# Altium PCB 1SL1 Xilinx Spartan-11E PQ208.PcbDoc (part 3 of 5)
Units mil, origin at the board's own origin, x right, y up, seen from the top; angles counter-clockwise.
Board outline 7086.61 x 1988.19 mil, 2 copper layers (Top Layer, Bottom Layer), stack 29.698 mil thick; 115 components, 126 nets, 642 pads, 225 vias.
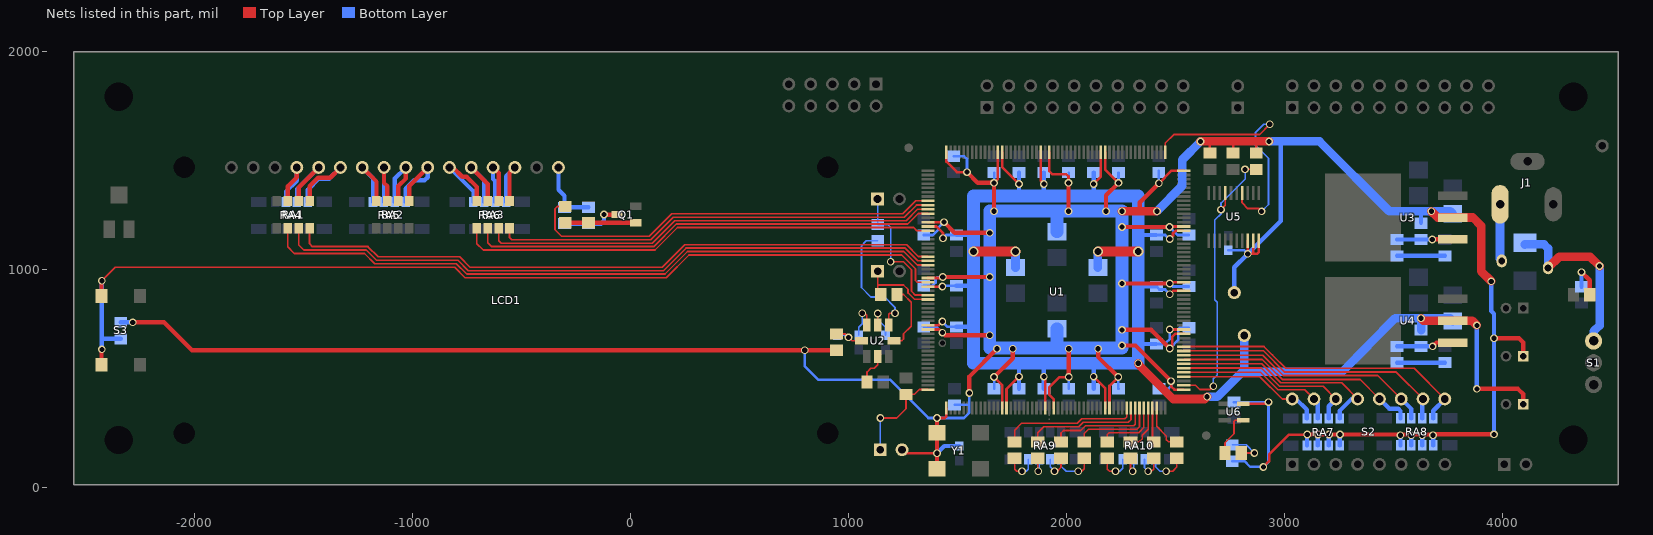
[diagram p2: the nets of this part, all layers, seen from the top]

## Via types
v1: diameter 35.43, hole 23.62, Top Layer to Bottom Layer, tented both sides, 168 vias
v2: diameter 59.06, hole 31.5, Top Layer to Bottom Layer, tented both sides, 27 vias
v3: diameter 47.24, hole 31.5, Top Layer to Bottom Layer, 18 vias
v4: diameter 47.24, hole 31.5, Top Layer to Bottom Layer, tented both sides, 11 vias
v5: diameter 35.43, hole 23.62, Top Layer to Bottom Layer, 1 vias

## Nets (pads, with @x,y where several pads share a name; then routed paths per layer and width w, separated by ;. In a path a pad name is that pad's centre, name@x,y a point inside that pad or via, vN(x,y) a via of type N, cw(c..) or ccw(c..) an arc to the next point about the centre after c; other vN are vias at no path point) (continued)
LCD_DB4: RA3.5 U1.15 | length 2201.6
  Top Layer w7.87: RA3.5@-704.87,1188.03 -704.87,1116.37 -676.13,1087.63 112.14,1087.63 215.49,1190.98 1298.78,1190.98 1313.55,1176.21 U1.15@1364.23,1176.21
LCD_DB5: RA3.6 U1.11 | length 2155.9
  Top Layer w7.87: RA3.6@-654.87,1188.03 -654.87,1121.49 -636.76,1103.38 105.62,1103.38 208.97,1206.72 1271.59,1206.72 1319.82,1254.95 U1.11@1364.23,1254.95
LCD_DB6: RA3.7 U1.10 | length 2095.7
  Top Layer w7.87: RA3.7@-604.87,1188.03 -604.87,1130.54 -593.45,1119.13 99.1,1119.13 202.44,1222.47 1263.83,1222.47 1316,1274.64 U1.10@1364.23,1274.64
LCD_DB7: RA3.8 U1.9 | length 2032.6
  Top Layer w7.87: RA3.8@-554.87,1188.03 -554.87,1144.52 -545.22,1134.87 92.57,1134.87 195.92,1238.22 1255.96,1238.22 1312.06,1294.32 U1.9@1364.23,1294.32
LCD_DB#0: LCD1.7 RA2.4 RA5.5 | length 360.5
  Top Layer w19.68: LCD1.7@-1230.65,1466.57 -1165.5,1401.41 RA2.4@-1165.5,1312.03
  Bottom Layer w19.68: LCD1.7@-1230.65,1466.57 -1181.24,1417.16 RA5.5@-1181.24,1308.09
LCD_DB#1: LCD1.8 RA2.3 RA5.6 | length 319.5
  Top Layer w19.68: LCD1.8@-1130.65,1466.57 -1130.65,1395.7 -1115.5,1380.54 RA2.3@-1115.5,1312.03
  Bottom Layer w19.68: RA5.6@-1131.24,1308.09 -1131.24,1465.98 LCD1.8@-1130.65,1466.57
LCD_DB#2: LCD1.9 RA2.2 RA5.7 | length 348.4
  Top Layer w19.68: RA2.2@-1065.5,1312.03 -1065.5,1380.94 -1030.65,1415.78 LCD1.9@-1030.65,1466.57
  Bottom Layer w19.68: RA5.7@-1081.24,1308.09 -1081.24,1415.98 LCD1.9@-1030.65,1466.57
LCD_DB#3: LCD1.10 RA2.1 RA5.8 | length 417.5
  Top Layer w19.68: RA2.1@-1015.5,1312.03 -1015.5,1381.72 LCD1.10@-930.65,1466.57
  Bottom Layer w19.68: RA5.8@-1031.24,1308.09 -1031.24,1368.34 -992.07,1407.51 -944.83,1407.51 -930.65,1421.68 LCD1.10@-930.65,1466.57
LCD_DB#4: LCD1.11 RA3.4 RA6.5 | length 431.4
  Top Layer w19.68: LCD1.11@-830.65,1466.57 -814.91,1466.57 -771.73,1423.39 -752.05,1423.39 -704.87,1376.21 RA3.4@-704.87,1312.03
  Bottom Layer w19.68: LCD1.11@-830.65,1466.57 -720.61,1356.53 RA6.5@-720.61,1308.09
LCD_DB#5: LCD1.12 RA3.3 RA6.6 | length 369.3
  Top Layer w19.68: LCD1.12@-730.65,1466.57 -654.87,1390.78 RA3.3@-654.87,1312.03
  Bottom Layer w19.68: LCD1.12@-730.65,1466.57 -670.61,1406.53 RA6.6@-670.61,1308.09
LCD_DB#6: LCD1.13 RA3.2 RA6.7 | length 327.8
  Top Layer w19.68: LCD1.13@-630.65,1466.57 -604.87,1440.78 RA3.2@-604.87,1312.03
  Bottom Layer w19.68: LCD1.13@-630.65,1466.57 -630.65,1413.61 -620.61,1403.57 RA6.7@-620.61,1308.09
LCD_DB#7: LCD1.14 RA3.1 RA6.8 | length 339.6
  Top Layer w19.68: RA3.1@-554.87,1312.03 -554.87,1442.35 LCD1.14@-530.65,1466.57
  Bottom Layer w19.68: RA6.8@-570.61,1308.09 -570.61,1426.61 LCD1.14@-530.65,1466.57
LCD_E: RA1.8 U1.21 | length 3018.1
  Top Layer w7.87: RA1.8@-1472.19,1188.03 -1472.19,1115.98 -1459.59,1103.38 -1204.67,1103.38 -1157.43,1056.13 -783.41,1056.13 -736.17,1008.89 144.76,1008.89 248.1,1112.24 1266.17,1112.24 1320.3,1058.1 U1.21@1364.23,1058.1
LCD_E#: LCD1.6 RA1.1 RA4.8 | length 493.5
  Top Layer w19.68: RA1.1@-1472.19,1312.03 -1472.19,1380.15 -1433.02,1419.32 -1377.9,1419.32 LCD1.6@-1330.65,1466.57
  Bottom Layer w19.68: RA4.8@-1480.06,1308.09 -1480.06,1364.4 -1429.28,1415.19 -1382.03,1415.19 LCD1.6@-1330.65,1466.57
LCD_LIGHT: R2.1 U1.8 | length 1938.7
  Top Layer w7.87: R2.1@-299.16,1287.43 -335.57,1287.43 -346.4,1276.61 -346.4,1180.15 -316.87,1150.62 86.05,1150.62 189.4,1253.97 1248.09,1253.97 1308.13,1314.01 U1.8@1364.23,1314.01
LCD_RS: RA1.6 U1.23 | length 3142.7
  Top Layer w7.87: RA1.6@-1572.19,1188.03 -1572.19,1101.79 -1542.28,1071.88 -1220.42,1071.88 -1173.17,1024.64 -799.16,1024.64 -751.91,977.39 157.8,977.39 261.15,1080.74 1253.01,1080.74 1315.02,1018.73 U1.23@1364.23,1018.73
LCD_RS#: LCD1.4 RA1.3 RA4.6 | length 350.7
  Top Layer w19.68: RA1.3@-1572.19,1312.03 -1572.19,1379.56 -1530.65,1421.09 LCD1.4@-1530.65,1466.57
  Bottom Layer w19.68: RA4.6@-1580.06,1308.09 -1580.06,1356.13 -1530.65,1405.54 LCD1.4@-1530.65,1466.57
LCD_RW: RA1.7 U1.22 | length 3079.2
  Top Layer w7.87: RA1.7@-1522.19,1188.03 -1522.19,1110.86 -1498.96,1087.63 -1212.54,1087.63 -1165.3,1040.39 -791.28,1040.39 -744.04,993.14 151.28,993.14 254.63,1096.49 1259.65,1096.49 1317.72,1038.42 U1.22@1364.23,1038.42
LCD_RW#: LCD1.5 RA1.2 RA4.7 | length 392.1
  Top Layer w19.68: RA1.2@-1522.19,1312.03 -1522.19,1375.03 LCD1.5@-1430.65,1466.57
  Bottom Layer w19.68: RA4.7@-1530.06,1308.09 -1530.06,1367.16 LCD1.5@-1430.65,1466.57
LEDS0: LED0.1 U1.102 | length 216.3
  Top Layer w7.87: U1.102@2413.44,363.22 2413.44,278.57 2457.73,234.28 2457.73,217.55 2467.57,207.71 LED0.1@2505.96,207.71
LEDS1: LED1.1 U1.101 | length 158
  Top Layer w7.87: U1.101@2393.76,363.22 2393.76,359.28 2393.76,213.61 LED1.1@2399.66,207.71
LEDS2: LED2.1 U1.100 | length 212.6
  Top Layer w7.87: LED2.1@2293.36,207.71 2333.72,207.71 2346.51,220.5 2346.51,237.24 2374.07,264.8 U1.100@2374.07,363.22
LEDS3: LED3.1 U1.99 | length 303.8
  Top Layer w7.87: LED3.1@2187.06,207.71 2187.06,241.17 2195.92,250.03 2330.76,250.03 2354.39,273.65 U1.99@2354.39,363.22
LEDS4: LED4.1 U1.98 | length 391
  Top Layer w7.87: LED4.1@2080.76,207.71 2080.76,246.09 2100.45,265.78 2322.89,265.78 2334.7,277.59 U1.98@2334.7,363.22
LEDS5: LED5.1 U1.97 | length 472.4
  Top Layer w7.87: LED5.1@1974.46,207.71 1974.46,248.06 1986.28,259.87 2065.02,259.87 2086.67,281.53 2308.13,281.53 2315.02,288.42 U1.97@2315.02,363.22
LEDS6: LED6.1 U1.96 | length 547.5
  Top Layer w7.87: LED6.1@1868.16,207.71 1868.16,249.05 1895.72,276.61 2056.16,276.61 2076.83,297.28 2283.52,297.28 2295.33,309.09 U1.96@2295.33,363.22
LEDS7: LED7.1 U1.95 | length 633.5
  Top Layer w7.87: LED7.1@1761.87,207.71 1761.87,260.86 1793.36,292.35 2049.63,292.35 2070.3,313.02 2266.79,313.02 2275.65,321.88 U1.95@2275.65,363.22
M0: JP5.1 R7.2 U1.52 | length 456.8
  Top Layer w7.87: v1(1145.72,316.96) 1220.53,316.96 1263.39,359.82 1263.39,425.43 1302.43,425.43 1324.86,447.87 U1.52@1364.23,447.87
  Bottom Layer w7.87: JP5.1@1145.72,171.29 v1(1145.72,316.96)
NetC15_1: C15.1 R11.2 U2.8 | length 181.4
  Top Layer w7.87: R11.2@944.15,702.79 984.31,702.79 1015.8,671.29 U2.8@1059.13,671.28
  Bottom Layer w7.87: C15.1@948.87,696.88 979.58,696.88 v1(1000.06,687.04)
NetC16_1: C16.1 U2.6 | length 166.8
  Top Layer w7.87: U2.6@1133.81,744.62 1134.01,744.81 v1(1134.01,796.78)
  Bottom Layer w7.87: v1(1134.01,796.78) 1134.01,768.95 1169.35,733.61 C16.1@1169.35,696.88
NetC19_1: C19.1 U2.7 | length 175.6
  Top Layer w7.87: v1(1063.05,797.28) 1074.86,797.28 1083.91,788.22 U2.7@1083.93,744.11
  Bottom Layer w7.87: C19.1@1047.3,696.88 1047.3,733.95 1063.05,749.7 v1(1063.05,797.28)
NetD1_2: D1.2 F1.2 S1.3 | length 832.9
  Top Layer w39.37: F1.2@4208.72,1005.94 4259.9,1057.11 4401.63,1057.12 v1(4444.94,1013.81)
  Bottom Layer w39.37: D1.2@4102.42,1113.11 4190.02,1113.22 4208.72,1094.52 F1.2@4208.72,1005.94 ; S1.3@4417.38,670.5 4417.38,714.6 4444.94,741.37 v1(4444.94,1013.81)
NetLCD1_16: LCD1.16 R8.1 R9.1 | length 304.7
  Bottom Layer w19.68: LCD1.16@-330.65,1466.57 -330.65,1364.2 -303.09,1336.65 -303.09,1283.5 R9.1@-192.86,1283.5
NetLED0_2: LED0.2 RA10.5 | length 218.1
  Top Layer w7.87: v1(2456.75,72.87) 2486.28,72.87 2505.96,92.55 LED0.2@2505.96,132.9
  Bottom Layer w7.87: RA10.5@2407.73,127.99 2407.73,93.54 2428.4,72.87 ; 2428.4,72.87 v1(2456.75,72.87) 2428.4,72.87
NetLED1_2: LED1.2 RA10.6 | length 141.8
  Top Layer w7.87: v1(2374.07,72.87) 2389.82,72.87 2399.66,82.71 LED1.2@2399.66,132.9
  Bottom Layer w7.87: RA10.6@2357.73,127.99 2357.73,89.2 v1(2374.07,72.87)
NetLED2_2: LED2.2 RA10.7 | length 121.1
  Top Layer w7.87: LED2.2@2293.36,132.9 2293.36,82.71 v1(2303.2,72.87)
  Bottom Layer w7.87: v1(2303.2,72.87) 2307.73,77.39 RA10.7@2307.73,127.99
NetLED3_2: LED3.2 RA10.8 | length 172.1
  Top Layer w7.87: LED3.2@2187.06,132.9 2187.06,82.71 2196.91,72.87 v1(2224.46,72.87)
  Bottom Layer w7.87: v1(2224.46,72.87) 2244.15,72.87 2257.73,86.45 RA10.8@2257.73,127.99
NetLED4_2: LED4.2 RA9.5 | length 200.5
  Top Layer w7.87: v1(2053.4,72.87) 2068.95,72.87 2080.76,84.68 LED4.2@2080.76,132.9
  Bottom Layer w7.87: RA9.5@1974.66,127.99 1974.66,96.49 1998.28,72.87 v1(2053.4,72.87)
NetLED5_2: LED5.2 RA9.6 | length 142.7
  Top Layer w7.87: v1(1944.94,72.87) 1956.75,72.87 1974.46,90.58 LED5.2@1974.46,132.9
  Bottom Layer w7.87: RA9.6@1924.66,127.99 1924.66,93.14 v1(1944.94,72.87)
NetLED6_2: LED6.2 RA9.7 | length 117.9
  Top Layer w7.87: LED6.2@1868.16,132.9 1868.16,74.84 v1(1870.13,72.87)
  Bottom Layer w7.87: v1(1870.13,72.87) 1874.66,77.39 RA9.7@1874.66,127.99
NetLED7_2: LED7.2 RA9.8 | length 166.5
  Top Layer w7.87: LED7.2@1761.87,132.9 1761.87,82.71 1771.71,72.87 v1(1795.33,72.87)
  Bottom Layer w7.87: v1(1795.33,72.87) 1815.02,72.87 1824.66,82.51 RA9.8@1824.66,127.99
NetLED8_1: LED8.1 R20.1 | length 176.9
  Top Layer w7.87: LED8.1@2801.24,156.53 v1(2861.28,156.53)
  Bottom Layer w7.87: R20.1@2759.9,193.93 2823.87,193.93 v1(2861.28,156.53)
NetLED8_2: LED8.2 U6.4 | length 206.6
  Top Layer w7.87: LED8.2@2726.43,156.53 2726.43,203.77 2767.77,245.11 2767.77,301.21 2773.68,307.12 U6.4@2810.09,307.12
NetLED9_1: LED9.1 R15.1 | length 186.8
  Top Layer w19.68: v1(4362.26,986.25) 4399.66,948.85 LED9.1@4399.66,881.92
  Bottom Layer w19.68: R15.1@4362.26,919.32 v1(4362.26,986.25)
NetQ1_1: Q1.1 R2.2 R3.2 | length 322.8
  Top Layer w19.68: R2.2@-299.16,1212.63 Q1.1@23.68,1212.63
NetQ1_3: Q1.3 R8.2 R9.2 | length 273.4
  Top Layer w19.68: v1(-121.99,1250.03) Q1.3@-62.94,1250.03
  Bottom Layer w19.68: R8.2@-303.09,1208.69 -135.77,1208.69 -121.99,1222.47 v1(-121.99,1250.03)
NetR10_2: R10.2 U2.2 | length 145.3
  Top Layer w7.87: R10.2@1084.7,482.31 1084.7,527.59 1102.42,545.31 1117.38,545.31 1133.91,561.84 U2.2@1133.91,598.46
NetR12_1: R12.1 R13.2 U3.1 | length 255.1
  Top Layer w19.68: v1@3678.01,1136.65 U3.1@3771.71,1136.65
  Bottom Layer w19.68: R12.1@3515.8,1135.86 3626.04,1135.86 v1(3677.22,1135.86)
NetR12_2: R12.2 R14.2 | length 220.5
  Bottom Layer w19.68: R12.2@3515.8,1061.06 R14.2@3736.28,1061.06
NetR17_1: R17.1 R18.2 U4.1 | length 263.2
  Top Layer w19.68: v1(3679.19,645.7) 3696.91,663.42 U4.1@3771.71,663.42
  Bottom Layer w19.68: R17.1@3515.8,645.7 v1(3679.19,645.7)
NetR17_2: R17.2 R19.1 | length 220.5
  Bottom Layer w19.68: R17.2@3515.8,570.9 R19.1@3736.28,570.9
PROG_B: R6.2 U1.106 U5.7 | length 1349.6
  Top Layer w7.87: U1.106@2537.46,467.55 2591.59,467.55 2611.28,447.87 2658.52,447.87 v1(2673.28,462.63) ; v1(2708.72,1272.67) 2728.4,1292.35 U5.7@2728.4,1348.46 ; v1(2818.96,1457.69) R6.2@2870.13,1457.71
  Bottom Layer w7.87: v1(2673.28,462.63) 2673.28,496.46 2691,514.18 2691,848.35 2680.17,859.18 2680.17,1225.11 2708.72,1253.65 2708.72,1303.18 2818.96,1413.43 v1(2818.96,1457.69)
PWR_IN: F1.1 J1.1 | length 311.8
  Bottom Layer w39.37: J1.1@3988.24,1346.49 3988.24,1047.28 F1.1@3996.12,1037.43
SW0: RA7.1 S2.16 U1.108 | length 702.2
  Top Layer w7.87: U1.108@2537.46,506.92 2886.87,506.92 2989.43,404.36 S2.16@3035.49,404.36
  Bottom Layer w19.68: S2.16@3035.49,404.36 3052.42,404.36 3102.22,354.56 3102.22,315.17 3102.42,314.98 3102.42,349.63
SW1: RA7.2 S2.15 U1.109 | length 812.8
  Top Layer w7.87: U1.109@2537.46,526.61 2889.82,526.61 2969.54,446.88 3092.97,446.88 S2.15@3135.49,404.36
  Bottom Layer w19.68: S2.15@3135.49,404.36 3152.42,387.43 RA7.2@3152.42,314.98 ; RA7.2@3152.22,319.91 S2.15@3152.22,387.63
SW2: RA7.3 S2.14 U1.110 | length 859.9
  Top Layer w7.87: U1.110@2537.46,546.29 2892.77,546.29 2976.43,462.63 3177.22,462.63 S2.14@3235.49,404.36
  Bottom Layer w19.68: RA7.3@3202.42,314.98 3202.42,371.29 S2.14@3235.49,404.36
SW3: RA7.4 S2.13 U1.111 | length 1005.5
  Top Layer w7.87: U1.111@2537.46,565.98 2895.36,565.98 2982.96,478.38 3261.47,478.38 S2.13@3335.49,404.36
  Bottom Layer w19.68: RA7.4@3252.42,314.98 3252.42,349.83 3306.94,404.36 S2.13@3335.49,404.36
SW4: RA8.1 S2.12 U1.112 | length 1127.4
  Top Layer w7.87: U1.112@2537.46,585.66 2897.94,585.66 2934.97,548.64 2989.48,494.13 3345.72,494.13 3435.49,404.36 S2.12@3434.31,404.36
  Bottom Layer w19.68: S2.12@3435.49,404.36 3480.73,359.12 3521.55,359.12 3531.55,349.12 RA8.1@3531.55,314.98
SW5: RA8.2 S2.11 U1.113 | length 1189.7
  Top Layer w7.87: U1.113@2537.46,605.35 2900.53,605.35 2937.3,568.57 2994.03,511.84 3428.01,511.84 S2.11@3535.49,404.36
  Bottom Layer w19.68: S2.11@3535.49,404.36 3581.55,358.3 RA8.2@3581.55,314.98
SW6: RA8.3 S2.10 U1.114 | length 1280.5
  Top Layer w7.87: U1.114@2537.46,625.03 2903.12,625.03 3000.56,527.59 3512.26,527.59 S2.10@3635.49,404.36
  Bottom Layer w19.68: RA8.3@3631.55,314.98 3631.55,400.43 S2.10@3635.49,404.36
SW7: RA8.4 S2.9 U1.115 | length 1409.3
  Top Layer w7.87: U1.115@2537.46,644.72 2905.7,644.72 2944.74,605.67 3005.11,545.31 3594.54,545.31 S2.9@3735.49,404.36
  Bottom Layer w19.68: RA8.4@3681.55,314.98 3681.55,350.43 S2.9@3735.49,404.36
TDI_C: U1.157 U5.4 | length 1188.3
  Top Layer w7.87: U1.157@2452.81,1536.45 2452.81,1578.77 2491.2,1617.16 2884.9,1617.16 v1(2932.14,1664.4) ; U5.4@2805.17,1348.46 2805.17,1304.17 2831.75,1277.59 2882.22,1277.59 v1(2894.94,1264.87)
  Bottom Layer w7.87: v1(2894.94,1264.87) 2926.24,1296.17 2926.24,1508.5 2866.2,1568.54 2866.2,1626.02 2904.58,1664.4 v1(2932.14,1664.4)
TEST: R16.2 S3.1 S3.2 U1.27 | length 4504
  Top Layer w7.87: v1(-2425.14,946.88) -2363.53,1008.5 -807.03,1008.5 -759.2,960.66 163.44,960.66 267.77,1064.99 1244.15,1064.99 1307.14,1002 1307.14,947.87 1315.02,939.99 U1.27@1364.23,939.99
  Top Layer w19.68: S3.1@-2427.11,560.66 -2427.11,629.95 v1(-2425.14,631.92) ; S3.2@-2427.11,876.02 v1@-2427.11,944.91
  Bottom Layer w19.68: v1(-2425.14,631.92) v1(-2425.14,946.88) ; -2425.14,681.13 R16.2@-2338.53,681.13
VCCINT: C3.1 C7.1 C8.1 C10.1 C20.1 C21.1 C25.1 C26.1 C28.1 C29.1 C30.1 C32.1 C34.2 C38.1 C39.1 C41.1 R18.1 TP3.1 U1.14 U1.28 U1.37 U1.67 U1.76 U1.90 U1.119 U1.128 U1.142 U1.172 U1.186 U1.195 U4.2 | length 9314.6
  Top Layer w11.81: U1.37@1364.14,742.67 1412.97,742.67 v1(1430.17,759.87) ; U1.28@1364.14,919.83 v1@1430.17,919.83 ; U1.14@1364.14,1195.43 1403.09,1195.43 1433.13,1165.39 v1(1433.13,1141.76) ; U1.195@1704.69,1535.98 1704.69,1467.64 v1(1781.55,1390.78) ; U1.67@1724.38,362.75 1724.38,449.75 v1(1781.55,506.92) ; U1.186@1881.86,1535.98 1881.86,1404.65 v1(1895.72,1390.78) ; v1(1895.72,506.92) 1901.54,501.1 U1.76@1901.54,362.75 ; v1(2124.07,506.92) 2177.13,453.86 U1.90@2177.13,362.75 ; v1(2124.07,1390.78) 2157.45,1424.16 U1.172@2157.45,1535.98 ; v1@2473.48,722.98 U1.119@2537.37,722.98 ; v1(2473.48,884.87) 2488.76,900.15 U1.128@2537.37,900.15 ; v1(2473.48,1137.83) 2488.24,1152.59 2488.24,1164.13 2499.86,1175.74 U1.142@2537.37,1175.74
  Top Layer w19.68: v1(3881.94,450.82) 4070.92,450.82 4094.54,427.2 C3.1@4094.54,379.95
  Top Layer w39.37: v1(2328.8,567.94) 2332.73,560.07 2488.47,404.34 2634.67,404.34 v1(2644.74,414.4) ; v1(3626.04,774.64) 3637.26,763.42 3860.69,763.42 v1(3881.94,742.16)
  Top Layer w47.24: v4(1572.89,1080.74) v4(1765.8,1080.74) ; v4(2143.76,1080.74) v4(2328.8,1080.74)
  Bottom Layer w11.81: v1(1430.17,759.87) 1454.78,735.27 C32.1@1494.15,735.27 ; v1(1430.17,920.31) 1430.17,924.24 C25.1@1494.15,924.24 ; v1(1433.13,1141.76) 1447.89,1156.53 C20.1@1494.15,1156.53 ; C34.2@2411.47,656.53 2449.72,656.53 ; C26.1@2411.47,920.31 2425.25,906.53 2451.83,906.53 v1(2473.48,884.87) ; C21.1@2411.47,1156.53 2451.83,1156.53 2470.53,1137.83 v1(2473.48,1137.83) ; 2449.29,656.95 2453.2,660.86 ; 2453.69,660.36 2473.48,680.15 v1(2473.48,723.46)
  Bottom Layer w19.68: C32.1@1494.15,735.27 1572.89,735.27 ; C25.1@1494.15,924.24 1572.89,924.24 ; C20.1@1494.15,1156.53 1572.89,1156.53 ; C38.1@1781.55,451.8 v1(1781.55,506.92) 1781.55,560.07 ; 1781.55,1340.58 v1(1781.55,1390.78) C7.1@1781.55,1442.94 ; C39.1@1895.72,451.8 1895.72,560.07 ; 1895.72,1340.58 C8.1@1895.72,1442.94 ; C41.1@2124.07,451.8 2124.07,560.07 ; 2124.07,1340.58 C10.1@2124.07,1442.94 ; 2328.8,656.53 C34.2@2411.47,656.53 ; 2328.8,920.31 C26.1@2411.47,920.31 ; 2328.8,1156.53 C21.1@2411.47,1156.53 ; v1(3881.94,450.82) v1(3881.94,742.16)
  Bottom Layer w39.37: C28.1@1765.8,1006.92 v4(1765.8,1080.74) ; C29.1@2143.76,1006.92 v4(2143.76,1080.74) ; v1(2644.74,414.4) 2691.98,414.4 2806.16,528.57 3263.83,528.57 3506.94,774.64 3758.91,774.64 C30.1@3771.71,761.84 ; 2815.02,528.57 TP3.1@2815.02,694.91 ; R18.1@3626.04,720.5 v1(3626.04,774.64)
  Bottom Layer w59.06: 1572.89,567.94 v1(2328.8,567.94) 2328.8,1335.66 2124.07,1335.66 1572.89,1335.66 v4(1572.89,1080.74) 1572.89,567.94
VCCO: C2.1 C4.1 C5.2 C6.1 C9.1 C11.1 C12.1 C14.1 C17.2 C18.2 C22.2 C23.1 C24.2 C31.1 C33.1 C35.1 C36.2 C37.1 C40.1 C42.1 C43.1 C44.2 C45.1 JP5.2 R4.1 R5.1 R6.1 R11.1 R13.1 R16.1 R20.2 RA7.5 RA7.6 RA7.7 RA7.8 RA8.5 RA8.6 RA8.7 RA8.8 TP2.1 U1.13 U1.26 U1.38 U1.53 U1.66 U1.78 U1.91 U1.105 U1.118 U1.130 U1.143 U1.156 U1.171 U1.184 U1.196 U1.208 U3.2 U5.18 U5.19 U5.20 U6.5 Y1.1 Y1.4 | length 21130.7
  Top Layer w11.81: JP5.2@1245.72,171.29 1261.47,155.54 v1(1405.57,155.54) ; U1.38@1364.14,722.98 1415.88,722.98 v1@1441.98,696.88 ; U1.26@1364.14,959.2 1427.73,959.2 v1(1432.14,963.61) v1@1437.06,963.61 ; U1.13@1364.14,1215.11 v1@1438.05,1215.11 ; v1(1405.57,316.96) 1441,316.96 1448.79,324.75 U1.53@1448.79,362.75 ; U1.208@1448.79,1535.98 1448.79,1493.23 1497.1,1444.91 v1(1543.36,1444.91) ; v1(1667.38,504.95) 1704.69,467.64 U1.66@1704.69,362.75 ; v1(1667.38,1395.7) 1685.01,1413.33 U1.196@1685.01,1535.98 ; U1.184@1921.23,1535.98 1921.23,1448.94 1934.11,1436.05 1998.09,1436.05 2008.91,1425.23 v1(2008.91,1395.7) ; U1.78@1940.91,362.75 1940.91,403.66 1921.31,423.26 1921.31,458.69 1967.57,504.95 v1(2009.9,504.95) ; U1.171@2177.13,1535.98 2177.13,1456.81 v1(2238.24,1395.7) ; U1.91@2196.82,362.75 2196.82,464.51 v1(2237.26,504.95) ; v1(2423.28,1393.73) 2481.35,1451.8 U1.156@2537.46,1451.8 ; v1(2472.5,1192.94) 2472.5,1195.43 U1.143@2537.37,1195.43 ; v1(2473.48,635.86) 2484.97,647.35 2484.97,689.9 2498.37,703.3 U1.118@2537.37,703.3 ; v1(2473.48,934.09) v1@2479.39,939.99 ; v1(2479.39,486.25) 2479.39,462.63 2494.62,447.39 U1.105@2537.37,447.39 ; v1@2479.86,939.52 U1.130@2537.37,939.52 ; R4.1@2657.54,1532.51 2657.54,1578.77 ; R5.1@2763.83,1532.51 2763.83,1578.77 ; U6.5@2810.09,381.92 2918.36,381.92 v1(2926.24,389.8) ; U5.18@2830.76,1129.95 v1(2830.76,1069.91) 2874.07,1069.91 2881.94,1077.79 U5.20@2881.94,1129.95 ; 2856.35,1069.91 U5.19@2856.35,1129.95 ; R6.1@2870.13,1532.51 2870.13,1587.63 2871.12,1588.61 ; v1(2902.61,92.55) 2929.11,119.04 2929.11,149.94 3020.33,241.17 v1(3103.8,241.17)
  Top Layer w19.68: v1(-2283.41,755.94) -2139.71,755.94 -2011.76,627.98 v1(799.25,627.98) R11.1@944.15,627.98 ; Y1.1@1405.57,72.87 v1(1405.57,316.96) ; v1(1432.14,963.61) v1(1647.69,963.61) ; v1(1438.05,1215.58) 1487.26,1166.37 v1(1647.69,1166.37) ; v1@1441.98,696.88 v1(1647.69,696.88) ; v1(1543.36,1444.91) 1592.57,1395.7 v1(1667.38,1395.7) v1(1667.38,1265.78) ; v1(1554.19,432.12) 1554.19,507.91 v1(1681.16,634.87) ; v1(1667.38,504.95) 1753.01,590.58 v1(1753.01,634.87) ; v1(2008.91,1265.78) v1(2008.91,1395.7) ; v1(2009.9,504.95) v1(2009.9,634.87) ; v1(2144.74,634.87) 2144.74,597.47 v1(2237.26,504.95) ; v1(2181.16,1265.78) 2181.16,1338.61 v1(2238.24,1395.7) ; v1(2253.99,649.64) 2316,649.64 v1(2479.39,486.25) ; v1(2253.99,721.49) 2387.85,721.49 v1(2473.48,635.86) ; v1(2253.99,934.09) v1(2473.48,934.09) ; v1(2253.99,1192.94) v1(2472.5,1192.94) ; 2335.68,1265.78 2335.68,1306.13 v1(2423.28,1393.73) ; v1(2614.23,1585.66) 2624.07,1578.77 2860.29,1578.77 ; v1(3103.8,241.17) v1@3682.93,241.17 ; v1(3681.16,238.22) 3685.09,242.16 v1(3960.68,242.16) ; v1(3960.68,683.1) 4074.86,683.1 4094.54,663.42 C2.1@4094.54,600.43
  Top Layer w39.37: v1(2253.99,1265.78) v1(2414.43,1265.78) ; v1(2614.23,1585.66) v1(2929.19,1585.66) ; v1(3673.28,1265.78) 3702.42,1236.65 3863.83,1236.65 3901.63,1198.85 3901.63,990.19 v1(3947.89,943.93)
  Bottom Layer w11.81: v1(799.25,627.98) 799.25,554.17 860.29,493.14 1191,493.14 1366.2,316.96 1529.58,316.96 1554.19,341.57 v1(1554.19,432.12) ; C31.1@1344.54,735.27 1403.6,735.27 v1(1430.17,708.69) ; C22.2@1344.54,924.24 1384.9,924.24 1398.68,938.02 1398.68,953.77 1408.52,963.61 v1(1432.14,963.61) ; C17.2@1344.54,1156.53 1386.87,1156.53 1410.49,1180.15 1410.49,1188.02 v1(1438.05,1215.58) ; C5.2@1482.34,1517.75 1530.57,1517.75 1543.36,1504.95 v1(1543.36,1444.91) ; C36.2@1486.28,377 1554.19,377 ; C37.1@1667.38,451.8 v1(1667.38,504.95) ; v1(1667.38,1395.7) C6.1@1667.38,1442.94 ; v1(2008.91,1395.7) C9.1@2009.9,1442.94 ; C40.1@2009.9,451.8 v1(2009.9,504.95) ; v1(2237.26,504.95) 2237.26,452.79 C42.1@2238.24,451.8 ; v1(2238.24,1395.7) C11.1@2238.24,1442.94 ; C43.1@2423.28,451.8 2467.57,451.8 2479.39,463.61 v1(2479.39,486.25) ; v1(2423.28,1393.73) C12.1@2423.28,1451.8 ; v1(2472.5,1192.94) 2508.91,1156.53 C18.2@2561.08,1156.53 ; v1(2473.48,635.86) 2511.87,674.24 2511.87,723.46 2519.74,731.33 C35.1@2561.08,731.33 ; v1(2473.48,934.09) 2487.26,920.31 C24.2@2561.08,920.31 ; C4.1@2741.2,1086.65 2814.03,1086.65 v1(2830.76,1069.91) ; R20.2@2759.9,119.13 2816,119.13 2842.56,92.55 v1(2902.61,92.55) 2926.24,116.17 v1(2926.24,389.8) C44.2@2767.77,389.8
  Bottom Layer w19.68: R16.1@-2338.53,755.94 v1(-2283.41,755.94) ; v1(1405.57,155.54) 1439.03,189.01 C45.1@1507.93,189.01 ; TP2.1@2769.07,891.75 2769.07,1008.22 v1(2830.76,1069.91) 2982.34,1220.5 2982.34,1585.66 v1(2929.19,1585.66) ; RA7.8@3102.42,190.98 v1@3102.42,239.79 ; RA7.7@3152.42,190.98 v1@3152.42,239.79 ; RA7.6@3202.42,190.98 v1@3202.42,239.79 ; RA7.5@3252.42,190.98 v1@3252.42,239.79 ; RA8.8@3531.55,190.98 v1@3531.55,239.79 ; RA8.7@3581.55,190.98 v1@3581.55,239.79 ; R13.1@3626.04,1212.63 3626.04,1266.76 ; RA8.6@3631.55,190.98 v1@3631.55,239.79 ; RA8.5@3681.55,190.98 v1@3681.55,239.79 ; v1(3947.89,943.93) 3947.89,808.1 3960.68,795.31 v1(3960.68,683.1) v1(3960.68,242.16)
  Bottom Layer w39.37: v1(2414.43,1265.78) 2530.57,1381.92 2530.57,1502 v1(2614.23,1585.66) ; v1(2929.19,1585.66) 3160.49,1585.66 3480.37,1265.78 3759.9,1265.78 C14.1@3771.71,1253.97
  Bottom Layer w59.06: 1956.75,639.8 C33.1@1956.75,726.41 ; C23.1@1956.75,1171.29 1956.75,1265.78 ; 1956.75,1265.78 v1(2253.99,1265.78) 2253.99,638.81 1647.69,638.81 v1(1647.69,696.88) v1(1647.69,963.61) 1647.69,1265.78 v1(1667.38,1265.78) 1956.75,1265.78
  other v1: 3531.16,238.22 3581.16,238.22 3631.16,238.22 3153.8,241.17 3203.8,241.17 3253.8,241.17
Xout: R22.2 U2.5 | length 590.7
  Top Layer w7.87: U2.5@1183.93,744.11 1183.91,780.35 1183.91,792.16 1189.03,797.28 v1(1212.65,797.28)
  Bottom Layer w7.87: R22.2@1134.36,1130.16 1080.95,1130.16 1059.11,1104.38 1059.11,915.39 1102.42,872.08 1165.97,872.08 1212.65,825.39 v1(1212.65,797.28) v1@1200.84,809.09
Xout_Alt: JP3.1 R22.1 U1.30 | length 630.6
  Top Layer w7.87: v1(1192.97,1033.5) 1252.02,1033.5 1288.75,996.77 1288.75,898.34 1306.16,880.94 U1.30@1364.23,880.94
  Bottom Layer w7.87: JP3.1@1133.65,1321.29 1133.65,1205.67 1134.36,1204.96 1178.98,1204.96 1192.97,1190.98 v1(1192.97,1033.5)
Yout: R21.2 U2.4 | length 309.9
  Top Layer w7.87: U2.4@1208.73,671.28 1244.15,671.29 1252.02,679.17 1252.02,702.79 1287.44,738.2 1287.44,847.91 1251.91,883.44 R21.2@1222.29,883.44
Yout_Alt: JP4.1 R21.1 U1.31 | length 376.1
  Top Layer w7.87: JP4.1@1133.65,990.58 1133.65,897.28 R21.1@1147.49,883.44 ; 1137.59,927.2 1252.02,927.2 1273.01,906.22 1273.01,890.47 1302.22,861.25 U1.31@1364.23,861.25
pads on no net: HDR2.1 HDR3.1 LCD1.M1 LCD1.M2 LCD1.M3 LCD1.M4 RA1.4 RA1.5 RA4.5 RA4.STP RA5.STP RA6.STP RA7.STP RA8.STP RA9.STP RA10.STP U1.3 U1.24 U1.29 U1.33 U1.34 U1.35 U1.36 U1.40 U1.41 U1.42 U1.43 U1.44 U1.45 U1.46 U1.47 U1.48 U1.49 U1.55 U1.56 U1.57 U1.58 U1.59 U1.60 U1.61 U1.62 U1.63 U1.64 U1.68 U1.69 U1.70 U1.71 U1.73 U1.74 U1.75 U1.81 U1.82 U1.83 U1.84 U1.86 U1.87 U1.88 U1.89 U1.93 U1.94 U1.116 U1.139 U1.140 U1.141 U1.145 U1.146 U1.147 U1.148 U1.149 U1.150 U1.151 U1.152 U1.154 U1.192 U1.193 U1.194 U1.198 U1.199 U1.200 U1.201 U1.202 U1.203 U1.204 U1.205 U1.206 U1.FID1 U1.FID2 U2.0 U2.1 U3.4 U4.4 U5.2 U5.9 U5.12 U5.13 U5.14 U5.15 U5.16 U6.1

## Polygon pours and split planes (outlines as drawn)
GND on Top Layer "Top Layer-GND" (solid, remove dead copper, pour order 8): -2555.06,9.87 -2555.06,1998.06 4531.55,1998.06 4531.55,9.87
GND on Bottom Layer "Bottom Layer-GND" (solid, remove dead copper, pour order 10): 4531.35,9.88 4531.35,1998.07 -2555.26,1998.07 -2555.26,9.88

## Keep-outs
Keep-Out Layer:
  circle w7.87: c4324.86,1791.37 r157.48
  circle w7.87: c-2348.37,1791.37 r157.48
  circle w7.87: c4324.86,217.55 r157.48
  circle w7.87: c-2348.37,216.57 r157.48
  lines w25: -2555.06,9.87 4531.55,9.87 4531.55,1998.06 -2555.06,1998.06 -2555.06,9.87

## Silkscreen, mask and mechanical layers (free items; w line width, h text height)
Top Overlay:
  drawing of 3334 lines, arcs and shapes, not listed
  text "SL" at -421.91,1833.53 h51.18
  text "REV 1.01" at -221.91,1833.53 h51.18
  text "CONTRAST" at -2480.26,1057.12 h39.37
  text "PWR" at 4504.94,819.87 h47.24 r90
  text "TEST/" at -2413.34,462.63 h39.37
  text "RESET" at -2421.2,395.69 h39.37
  text "7" at 1759.9,265.78 h47.24
  text "6" at 1854.39,265.78 h47.24
  text "5" at 1960.68,265.78 h47.24
  text "4" at 2063.05,265.78 h47.24
  text "3" at 2173.28,265.78 h47.24
  text "2" at 2275.65,265.78 h47.24
  text "1" at 2385.88,265.78 h47.24
  text "0" at 2488.24,265.78 h47.24
  text "DONE" at 2679.9,47.11 h47.24
1_BOARD_OUTLINE:
  the board outline again, w7.87
2_DIMENSION:
  text "Dimensions in millimetres (mm)" at -2555.06,-305.09 h29.53
15_TOP_COURTYARD:
  lines w7.87: -2543.25,1612.24 4531.55,1612.24
Drill Drawing:
  circle w5: c2664.56,5582.5 r25
  circle w5: c2664.56,5020 r15
  circle w5: c2664.56,5020 r25
  lines w5: 2595.5,4511.25 5464.73,4511.25 ; 2595.5,5636.25 5464.73,5636.25 ; 3000.66,4398.75 3000.66,5748.75 ; 3516.02,4398.75 3516.02,5748.75 ; 4517.22,4398.75 4517.22,5748.75 ; 4888.63,4398.75 4888.63,5748.75 ; 2595.5,4398.75 5464.73,4398.75 5464.73,5748.75 2595.5,5748.75 2595.5,4398.75 ; 2639.56,4545 2689.56,4545 2689.56,4595 2639.56,4595 2639.56,4545 ; 2639.56,4707.5 2689.56,4707.5 2664.56,4657.5 2639.56,4707.5 ; 2639.56,4782.5 2652.06,4782.5 2652.06,4770 2677.06,4770 2677.06,4782.5 2689.56,4782.5 2689.56,4807.5 2677.06,4807.5 2677.06,4820 2652.06,4820 2652.06,4807.5 2639.56,4807.5 2639.56,4782.5 ; 2639.56,4882.5 2664.56,4895 2689.56,4882.5 2677.06,4907.5 2689.56,4932.5 2664.56,4920 2639.56,4932.5 2652.06,4907.5 2639.56,4882.5 ; 2639.56,5120 2652.06,5120 2664.56,5107.5 2677.06,5120 2689.56,5120 2677.06,5132.5 2689.56,5145 2677.06,5145 2664.56,5157.5 2652.06,5145 2639.56,5145 2652.06,5132.5 2639.56,5120 ; 2639.56,5220 2689.56,5220 2689.56,5270 2639.56,5270 2639.56,5220 ; 2639.56,5357.5 2664.56,5332.5 2689.56,5357.5 2664.56,5382.5 2639.56,5357.5 ; 2639.56,5445 2639.56,5457.5 2652.06,5470 2639.56,5482.5 2639.56,5495 2652.06,5495 2664.56,5482.5 2677.06,5495 2689.56,5495 2689.56,5482.5 2677.06,5470 2689.56,5457.5 2689.56,5445 2677.06,5445 2664.56,5457.5 2652.06,5445 2639.56,5445 ; 2649.56,4555 2679.56,4555 2679.56,4585 2649.56,4585 2649.56,4555
  text "Symbol" at 2663,5670 h54
  text "Hit Count" at 3034.41,5670 h54
  text "Finished Hole Size" at 3549.77,5670 h54
  text "Plated" at 4550.97,5670 h54
  text "Hole Type" at 4922.38,5670 h54
  text "1" at 3034.41,5557.5 h45
  text "20,00mil (0,508mm)" at 3549.77,5557.5 h45
  text "NPTH" at 4550.97,5557.5 h45
  text "Round" at 4922.38,5557.5 h45
  text "1" at 3034.41,5445 h45
  text "39,37mil (1,000mm)" at 3549.77,5445 h45
  text "PTH" at 4550.97,5445 h45
  text "Slot" at 4922.38,5445 h45
  text "2" at 3034.41,5332.5 h45
  text "39,37mil (1,000mm)" at 3549.77,5332.5 h45
  text "PTH" at 4550.97,5332.5 h45
  text "Slot" at 4922.38,5332.5 h45
  text "3" at 3034.41,5220 h45
  text "43,31mil (1,100mm)" at 3549.77,5220 h45
  text "PTH" at 4550.97,5220 h45
  text "Round" at 4922.38,5220 h45
  text "4" at 3034.41,5107.5 h45
  text "98,43mil (2,500mm)" at 3549.77,5107.5 h45
  text "NPTH" at 4550.97,5107.5 h45
  text "Round" at 4922.38,5107.5 h45
  text "4" at 3034.41,4995 h45
  text "129,92mil (3,300mm)" at 3549.77,4995 h45
  text "NPTH" at 4550.97,4995 h45
  text "Round" at 4922.38,4995 h45
  text "6" at 3034.41,4882.5 h45
  text "29,53mil (0,750mm)" at 3549.77,4882.5 h45
  text "PTH" at 4550.97,4882.5 h45
  text "Round" at 4922.38,4882.5 h45
  text "58" at 3034.41,4770 h45
  text "31,50mil (0,800mm)" at 3549.77,4770 h45
  text "PTH" at 4550.97,4770 h45
  text "Round" at 4922.38,4770 h45
  text "95" at 3034.41,4657.5 h45
  text "35,43mil (0,900mm)" at 3549.77,4657.5 h45
  text "PTH" at 4550.97,4657.5 h45
  text "Round" at 4922.38,4657.5 h45
  text "170" at 3034.41,4545 h45
  text "23,62mil (0,600mm)" at 3549.77,4545 h45
  text "PTH" at 4550.97,4545 h45
  text "Round" at 4922.38,4545 h45
  text "344 Total" at 3034.41,4432.5 h45
  text "Slot definitions :" at 2663,4328.77 h45
  text "Routed Path Length" at 3430.52,4328.77 h45
  text "= Calculated from tool start centre position to tool end centre position." at 4250.52,4328.77 h45
  text "Hole Length" at 3430.52,4258.79 h45
  text "= Routed Path Length + Tool Size = Slot length as defined in the PCB layout" at 3943.12,4258.79 h45